# Altium PCB Group2_PCB.PcbDoc
Units mm, origin at the board's own origin, x right, y up, seen from the top; angles counter-clockwise.
Board outline 87.88 x 127 mm, 2 copper layers (Top Layer, Bottom Layer); 106 components, 61 nets, 301 pads, 64 vias.
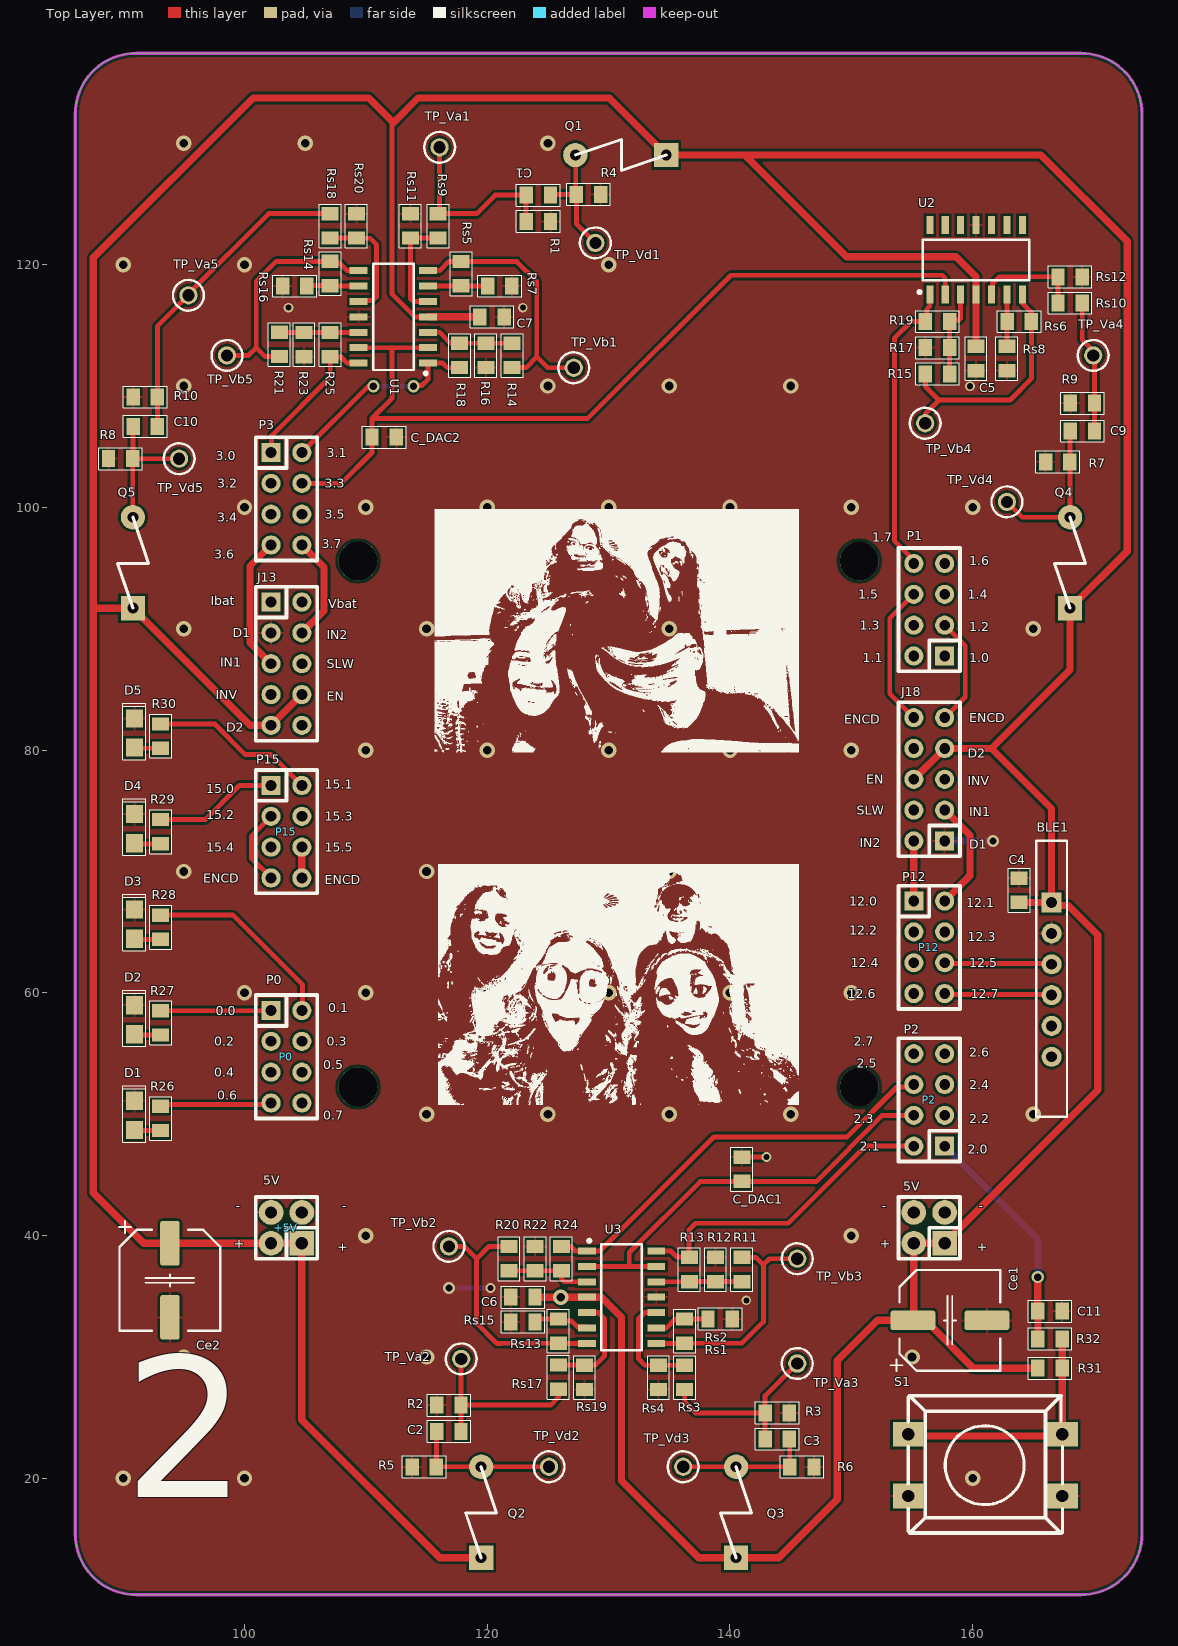
[diagram p0: Top Layer view]
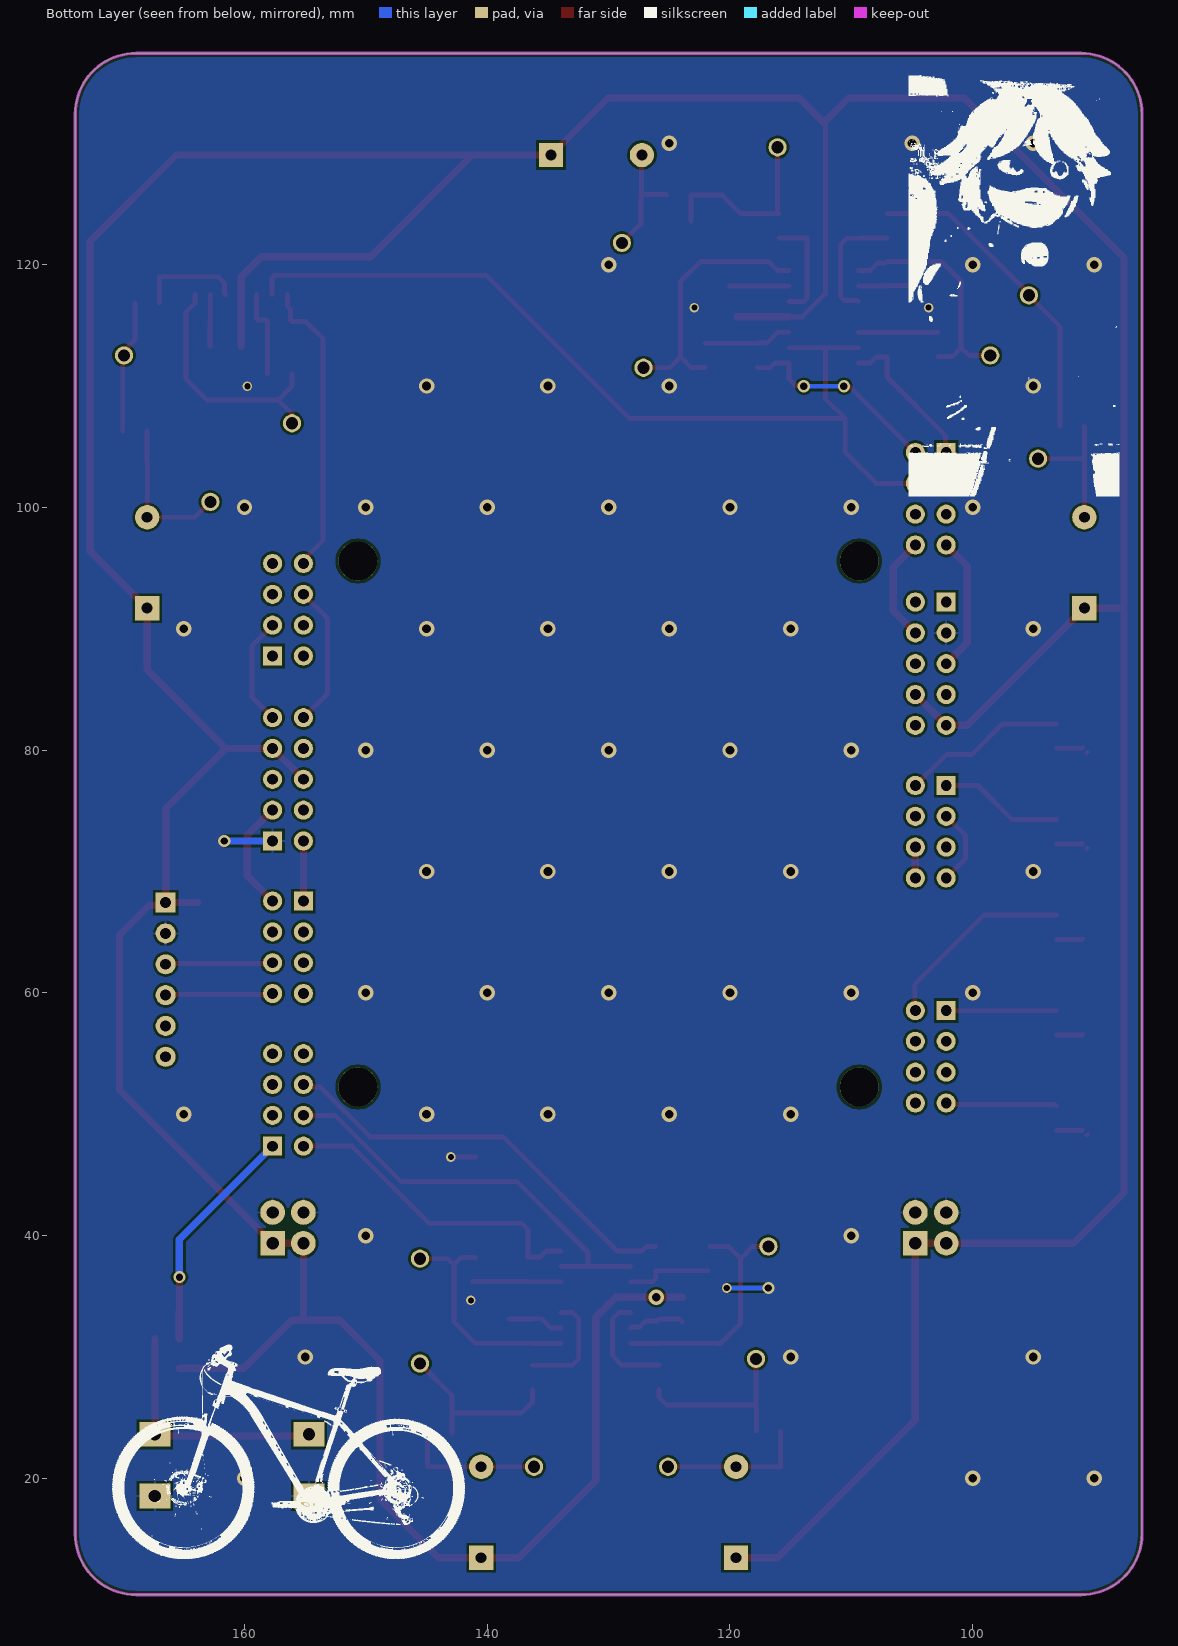
[diagram p1: Bottom Layer view, seen from below]

## Layer stack, top to bottom
Top Solder: solder mask 0.0102, Solder Resist, Dk 3.5
Top Layer: signal copper 0.0356
Dielectric 1: dielectric 0.32, FR-4, Dk 4.8
Bottom Layer: signal copper 0.0356
Bottom Solder: solder mask 0.0102, Solder Resist, Dk 3.5

## Board outline
86.058,15.414 86.058,132.414 cw(c91.058,132.414) 91.058,137.414 168.942,137.414 cw(c168.942,132.414) 173.942,132.414 173.942,15.414 cw(c168.942,15.414) 168.942,10.414 91.058,10.414 cw(c91.058,15.414)

## Design rules (kind name [scope] priority, off if disabled: settings)
BoardOutlineClearance [All] p1: gap=0.2 ignorepadtopadclearanceinfootprint=FALSE
Clearance [All] p1: gap=0.203 ignorepadtopadclearanceinfootprint=FALSE except(0.25: Arc-Hole Track-Hole SMDPad-Hole THPad-Hole Via-Hole Fill-Hole Poly-Hole Region-Hole Text-Hole)
ComponentClearance [All] p1: gap=0.127 collisioncheckmode=3 verticalgap=0.127 showdistances=TRUE
DiffPairsRouting [All] p1: maxlimit=0.381 minlimit=0.203 mostfreqgap=0.203 toplayer_minwidth=0.203 toplayer_maxwidth=25.4 toplayer_prefwidth=0.203 bottomlayer_minwidth=0.203 bottomlayer_maxwidth=25.4 bottomlayer_prefwidth=0.203 maxuncoupledlength=12.7
Height [All] p1: minheight=0 maxheight=1816.048 prefheight=12.7
HoleSize [All] p1: absolutevalues=TRUE maxlimit=6.3 minlimit=0.3 maxpercent=80.000 minpercent=20.000
HoleToHoleClearance [All] p1: gap=0.25 allowstackedmicrovias=FALSE
MinimumAnnularRing [All] p1: minimumring=0.076
MinimumSolderMaskSliver [All] p1: minsoldermaskwidth=0
PlaneClearance [All] p1: clearance=0.203
PlaneConnect PlaneConnectPowerPads [InPadClass('PowerPads')] p1: planeconnectstyle=Direct reliefexpansion=0.508 reliefentries=4 reliefconductorwidth=0.254 reliefairgap=0.254
PlaneConnect [All] p2: pad.planeconnectstyle=Relief pad.reliefexpansion=0.3 pad.reliefentries=4 pad.reliefconductorwidth=0.203 pad.reliefairgap=0.203 via.planeconnectstyle=Direct via.reliefexpansion=0.3 via.reliefentries=4 via.reliefconductorwidth=0.127 via.reliefairgap=0.127
PolygonConnect PolygonConnectPowerPads [All vs (InPadClass('PowerPads'))] p1: connectstyle=Direct reliefconductorwidth=0.254 reliefentries=4 polygonreliefangle="90 Angle" airgapwidth=0.254
PolygonConnect [All] p2: thpad.connectstyle=Relief thpad.reliefconductorwidth=0.203 thpad.reliefentries=4 thpad.polygonreliefangle="90 Angle" thpad.airgapwidth=0.203 smdpad.connectstyle=Relief smdpad.reliefconductorwidth=0.203 smdpad.reliefentries=4 smdpad.polygonreliefangle="90 Angle" smdpad.airgapwidth=0.203 via.connectstyle=Direct via.reliefconductorwidth=0.127 via.reliefentries=4 via.polygonreliefangle="90 Angle" via.airgapwidth=0.127
RoutingVias [All] p1: holewidth=0.3 width=0.6 viastyle="Through Hole" minholewidth=0.3 minwidth=0.6 maxholewidth=0.6 maxwidth=6.6
SilkToSilkClearance [All] p1: silktosilkclearance=0
SilkToSolderMaskClearance [IsPad] p1: minsilkscreentomaskgap=0.127 clearancetoexposedcopper=TRUE
SolderMaskExpansion [All] p1: expansion=0.075 istentingtop=FALSE
SupplyNets "Schematic Supply Nets_3" [InNet('Vref_DAC')] p1: voltage=0.000
SupplyNets "Schematic Supply Nets_2" [InNet('GND')] p2: voltage=0.000
SupplyNets "Schematic Supply Nets_1" [InNet('5V')] p3: voltage=0.000
SupplyNets "Schematic Supply Nets" [InNet('Vref_DAC2')] p4: voltage=0.000
Width [All] p1: maxlimit=25.4 minlimit=0.203 preferedwidth=0.203 minimp=50.000000 maximp=50.000000 favimp=50.000000
20 further rules are at their usual default settings.

## Components (designator, comment, footprint, x,y, rotation, side; value= is the part's Value field where it differs from the comment)
5V "5V" IDC4 157.686,39.37 r90 top locked
+5V "5V" IDC4 104.727,39.37 r90 top locked
BLE1 "BLE Module Header" HM10_HDR1X6 166.497,67.437 r270 top
C1 "0.27u" "0805 CAP" 124.206,125.73 r180 top
C2 "0.27u" "0805 CAP" 116.84,23.876 r0 top
C3 "0.27u" "0805 CAP" 143.891,23.241 r180 top
C4 "100nF" "0805 CAP" 163.83,68.453 r90 top
C5 "100nF" "0805 CAP" 160.274,112.268 r270 top
C6 "100nF" "0805 CAP" 122.936,34.925 r180 top
C7 "100nF" "0805 CAP" 120.396,115.697 r0 top
C9 "0.27u" "0805 CAP" 169.037,106.299 r0 top
C10 "0.27u" "0805 CAP" 91.821,106.68 r0 top
C11 "100n" "0805 CAP" 166.37,33.782 r0 top
C_DAC1 "0.1uF" "0805 CAP" 140.97,45.466 r90 top
C_DAC2 "0.1uF" "0805 CAP" 111.506,105.791 r0 top
Ce1 "100uF" "CAP POL 8x5.4mm SMT" 158.115,33.02 r0 top
Ce2 "100uF" "CAP POL 8x5.4mm SMT" 93.853,36.322 r270 top
D1 "LTST-C170KGKT" "0805 LED" 90.932,49.911 r90 top
D2 "LTST-C170KGKT" "0805 LED" 90.932,57.785 r90 top
D3 "LTST-C170KGKT" "0805 LED" 90.932,65.659 r90 top
D4 "LTST-C170KGKT" "0805 LED" 90.932,73.533 r90 top
D5 "LTST-C170KGKT" "0805 LED" 90.932,81.407 r90 top
J13 "CON10" IDC10 102.187,92.202 r270 top locked
J18 "CON10" IDC10 157.686,72.517 r90 top locked
P0 "P0" idc8 102.187,58.547 r270 top locked
P1 "P1" idc8 157.686,87.757 r90 top locked
P2 "P2" idc8 157.686,47.371 r90 top locked
P3 "P3" idc8 102.187,104.521 r270 top locked
P12 "P12" idc8 155.146,67.564 r270 top locked
P15 "P15" idc8 102.187,77.089 r270 top locked
Q1 "VEMT3700" VEMT3700 137.287,132.842 r180 top locked
Q2 "VEMT3700" VEMT3700 123.31,10.922 r90 top locked
Q3 "VEMT3700" VEMT3700 144.31,10.922 r90 top locked
Q4 "VEMT3700" VEMT3700 171.831,89.154 r90 top locked
Q5 "VEMT3700" VEMT3700 94.615,89.154 r90 top locked
R1 "100k" "0805 RES" 124.206,123.571 r180 top
R2 "100k" "0805 RES" 116.84,26.035 r0 top
R3 "100k" "0805 RES" 143.891,25.4 r180 top
R4 "33k" "0805 RES" 128.339,125.792 r180 top
R5 "33k" "0805 RES" 114.808,20.955 r0 top
R6 "33k" "0805 RES" 145.923,20.955 r180 top
R7 "33k" "0805 RES" 167.005,103.759 r0 top
R8 "33k" "0805 RES" 89.789,104.013 r0 top
R9 "100k" "0805 RES" 169.037,108.585 r0 top
R10 "100k" "0805 RES" 91.821,109.093 r0 top
R11 "2k" "0805 RES" 140.97,37.211 r270 top
R12 "40k" "0805 RES" 138.811,37.211 r90 top
R13 "50k" "0805 RES" 136.652,37.211 r270 top
R14 "2k" "0805 RES" 122.047,112.522 r90 top
R15 "2k" "0805 RES" 157.099,110.998 r0 top
R16 "40k" "0805 RES" 119.888,112.522 r270 top
R17 "40k" "0805 RES" 157.099,113.157 r180 top
R18 "50k" "0805 RES" 117.729,112.522 r90 top
R19 "50k" "0805 RES" 157.099,115.316 r0 top
R20 "2k" "0805 RES" 121.793,38.1 r270 top
R21 "2k" "0805 RES" 102.87,113.427 r90 top
R22 "40k" "0805 RES" 123.952,38.1 r90 top
R23 "40k" "0805 RES" 104.902,113.411 r270 top
R24 "50k" "0805 RES" 126.111,38.1 r270 top
R25 "50k" "0805 RES" 107.061,113.411 r90 top
R26 "68" "0805 RES" 93.091,49.657 r270 top
R27 "68" "0805 RES" 93.091,57.531 r270 top
R28 "68" "0805 RES" 93.091,65.405 r270 top
R29 "68" "0805 RES" 93.091,73.279 r270 top
R30 "68" "0805 RES" 93.091,81.153 r270 top
R31 "10k" "0805 RES" 166.37,29.083 r0 top
R32 "10k" "0805 RES" 166.37,31.496 r0 top
Rs1 "36k" "0805 RES" 136.271,32.131 r270 top
Rs2 "10k" "0805 RES" 139.192,33.147 r180 top
Rs3 "10k" "0805 RES" 136.271,28.321 r90 top
Rs4 "36k" "0805 RES" 134.112,28.321 r90 top
Rs5 "36k" "0805 RES" 117.856,119.253 r90 top
Rs6 "36k" "0805 RES" 163.83,115.316 r0 top
Rs7 "10k" "0805 RES" 121.031,118.237 r180 top
Rs8 "10k" "0805 RES" 162.814,112.268 r90 top
Rs9 "10k" "0805 RES" 115.951,123.19 r270 top
Rs10 "10k" "0805 RES" 168.021,116.84 r180 top
Rs11 "36k" "0805 RES" 113.665,123.19 r270 top
Rs12 "36k" "0805 RES" 168.021,118.999 r180 top
Rs13 "36k" "0805 RES" 125.857,32.131 r270 top
Rs14 "36k" "0805 RES" 107.061,119.269 r90 top
Rs15 "10k" "0805 RES" 122.936,32.893 r0 top
Rs16 "10k" "0805 RES" 104.14,118.237 r0 top
Rs17 "10k" "0805 RES" 125.857,28.337 r90 top
Rs18 "10k" "0805 RES" 107.061,123.19 r270 top
Rs19 "36k" "0805 RES" 128.016,28.321 r90 top
Rs20 "36k" "0805 RES" 109.22,123.19 r270 top
S1 "SW-PB" SW-PB 164.846,18.034 r180 top
TP_Va1 "5003" TP_TH 116.078,129.667 r90 top
TP_Va2 "5003" TP_TH 117.856,29.845 r90 top
TP_Va3 "5003" TP_TH 145.542,29.464 r90 top
TP_Va4 "5003" TP_TH 169.926,112.522 r90 top
TP_Va5 "5003" TP_TH 95.377,117.475 r90 top
TP_Vb1 "5003" TP_TH 127.127,111.506 r90 top
TP_Vb2 "5003" TP_TH 116.84,39.116 r90 top
TP_Vb3 "5003" TP_TH 145.542,38.1 r90 top
TP_Vb4 "5003" TP_TH 156.083,106.934 r90 top
TP_Vb5 "5003" TP_TH 98.552,112.522 r90 top
TP_Vd1 "5003" TP_TH 128.905,121.793 r90 top
TP_Vd2 "5003" TP_TH 125.095,20.955 r90 top
TP_Vd3 "5003" TP_TH 136.144,20.955 r90 top
TP_Vd4 "5003" TP_TH 162.814,100.457 r90 top
TP_Vd5 "5003" TP_TH 94.615,104.013 r90 top
U1 "LM324DR2G" SOIC-14 112.268,115.697 r180 top
U2 "LM324DR2G" SOIC-14 160.274,120.396 r90 top
U3 "" SOIC-14 131.064,34.925 r0 top

## Footprints (in the part's own frame and the unit in brackets; to place one, negate y for a bottom-side part, rotate by r counter-clockwise, add the part's x,y. Pads: shape width x height; smd on the part's side, far side on the other; paste and mask are expansions set on the pad)
"0805 CAP" [mm] "http://www.digikey.co.nz/Web%20Export/Supplier%20Content/Vishay_8026/PDF/VishayBeyschlag_SolderPad.pdf?redirected=1 with dimension G modified by +0.25mm"
  rect 1.1x1.4 smd: 1(-1,0) 2(1,0)
  silkscreen extent -1.8,-0.9 1.8,0.9, body extent -1.04,-0.66 1.04,0.66, height 0.61
"0805 LED" [mm] "RED AS AlGaAs SMD LED, Body; 2mm x 1.25 mm (LxW)"
  rect 1.5x1.4 smd: 1(-1.2,0) 2(1.2,0)
  silkscreen extent -2.2,-0.95 2.45,0.95, body extent -1,-0.63 1,0.63, height 1.1
"0805 RES" [mm] "http://www.digikey.co.nz/Web%20Export/Supplier%20Content/Vishay_8026/PDF/VishayBeyschlag_SolderPad.pdf?redirected=1 with dimension G modified by +0.25mm"
  rect 1.1x1.4 smd: 1(-1,0) 2(1,0)
  silkscreen extent -1.8,-0.9 1.8,0.9, body extent -1.04,-0.66 1.04,0.66, height 0.61
"CAP POL 8x5.4mm SMT" [mm]
  round 0.508 on Mech15: 0(0,0)
  rrect25% 3.7x1.6 smd: 1(-3.05,0) 2(3.05,0)
  silkscreen extent -4.9,-4.2 4.15,4.15, body extent -4.5,-4.15 4.5,4.15, height 5.4
HM10_HDR1X6 [mil] "Connector; Header; 6 Position"
  rect 65x65 hole 35.43: 1(0,0)
  round 65 hole 35.43: 2(100,0) 3(200,0) 4(300,0) 5(400,0) 6(500,0)
  silkscreen extent -200,-50 695,50, body extent -142,-39 571,228, height 1843
IDC4 [mil]
  rect 80x80 hole 40: 1(0,0)
  round 80 hole 40: 2(0,100) 3(100,0) 4(100,100)
  silkscreen extent -50,-50 150,150
idc8 [mil]
  rect 62x62 hole 35: 1(0,0)
  round 62 hole 35: 2(0,100) 3(100,0) 4(100,100) 5(200,0) 6(200,100) 7(300,0) 8(300,100)
  silkscreen extent -50,-50 350,150
IDC10 [mil]
  rect 62x62 hole 35: 1(0,0)
  round 62 hole 35: 2(0,100) 3(100,0) 4(100,100) 5(200,0) 6(200,100) 7(300,0) 8(300,100) 9(400,0) 10(400,100)
  silkscreen extent -50,-50 450,150
SOIC-14 [mm] "SOIC, 14-Leads, Body 8.75x4mm, Pitch 1.27mm"
  rect 1.48x0.58 smd: 1(-2.86,3.81) 2(-2.86,2.54) 3(-2.86,1.27) 4(-2.86,0) 5(-2.86,-1.27) 6(-2.86,-2.54) 7(-2.86,-3.81) 8(2.86,-3.81) 9(2.86,-2.54) 10(2.86,-1.27) 11(2.86,0) 12(2.86,1.27) 13(2.86,2.54) 14(2.86,3.81)
  silkscreen extent -2.79,-4.38 1.67,4.77, body extent -3.1,-4.38 3.1,4.37, height 1.75
SW-PB [mil]
  rect 100x80 hole 40: 1(-100,-20) 1(400,-20) 2(-100,-220) 2(400,-220)
  silkscreen extent -100,-345 400,100
TP_TH [mm] "Test Point, Through Hole, Dia 2.54mm"
  round 1.5 hole 1: 1(0,0)
  silkscreen extent -1.27,-1.27 1.27,1.27, body extent -1.27,-1.27 1.27,1.27, height 4.57
VEMT3700 [mm]
  rect 2x2 hole 0.9: 1(2.54,3.81)
  round 2 hole 0.9: 2(10.033,3.81)
  silkscreen extent 2.54,2.54 10.03,5.08

## Part data
5V +5V: library part CON4, "Connector"
BLE1: library part BLEModule_TH, "2.54mm pitch 6-pin header for BLE module", LatestRevisionDate=17-Jul-2002, LatestRevisionNote="Re-released for DXP Platform.", Publisher="Altium Limited"
C1 C2 C3 C4 C5 C6 C7 C9 C10 C11 C_DAC1 C_DAC2: library part CerCap_SMT_0805, "SMT ceramic capacitor 0805 size"
Ce1 Ce2: library part ElecCap_SMT_8D0, "CAP ALUM 22UF 20% 50V SMD (Model: UWX1H220MCL1GB)", Capacitance 1="22 µF", ESR (Equivalent Series Resistance)=-, Lifetime @ Temp.="2000 Hrs @ 85°C", Manufacturer=Nichicon, Manufacturer Part Number=UWX1V220MCL1GB, Operating Temperature="-40°C ~ 85°C", Package / Case="Radial, Can - SMD", Supplier Part Number 1=493-2136-1-ND, Tolerance=±20%, Applications="General Purpose", Category=Capacitors, ComponentLink1Description=http://nichicon-us.com/english/products/pdfs/e-uwx.pdf, ComponentLink1URL=http://nichicon-us.com/english/products/pdfs/e-uwx.pdf, Height - Seated (Max)="0.213\" (5.40mm)", Lead Spacing=-, Mounting Type="Surface Mount", Packaging="Cut Tape (CT)", Part Status=Active, Polarization=Polar, Pricing 1="1=0.59, 10=0.406, 100=0.2304, 500=0.16268 (NZD)", Ratings=-, Revision="July-2002: Re-released for DXP Platform.", RoHS="RoHS Compliant", Size / Dimension="0.248\" Dia (6.30mm)", Stock 1=680, Supplier 1=Digi-Key, Surface Mount Land Size="0.260\" L x 0.260\" W (6.60mm x 6.60mm)"
D1 D2 D3 D4 D5: library part LED_SMT_0805, "SMT LED 0805 size", Color=Green, Current - Test=20mA, Lens Color=Colorless, Manufacturer="Lite-On Inc.", Millicandela Rating=35mcd, Package / Case="0805 (2012 Metric)", Supplier Part Number 1=160-1414-1-ND, Voltage - Forward (Vf) (Typ)=2V, Category=Optoelectronics, ComponentLink1Description=http://optoelectronics.liteon.com/upload/download/DS22-2000-073/LTST-C170KGKT.pdf, ComponentLink1URL=http://optoelectronics.liteon.com/upload/download/DS22-2000-073/LTST-C170KGKT.pdf, Features=-, Height (Max)=1.10mm, Lens Style/Size="Rectangle with Flat Top, 1.40mm x 1.25mm", Lens Transparency=Clear, Manufacturer Part Number=LTST-C170KGKT, Mounting Type="Surface Mount", Packaging="Cut Tape (CT)", Part Status=Active, Pricing 1="1=0.62, 10=0.459, 25=0.338, 100=0.2415, 250=0.16416, 500=0.14486, 1000=0.11347 (NZD)", RoHS="RoHS Compliant", Size / Dimension="2.00mm L x 1.25mm W", Stock 1=503069, Supplier 1=Digi-Key, Viewing Angle=130°, Wavelength - Dominant=571nm, Wavelength - Peak=574nm
J13 J18: "Connector"
P0 P1 P2 P3: library part CON8, "Connector"
P12 P15: library part CON8_1, "Connector"
Q1 Q2 Q3 Q4 Q5: "Silicon NPN Phototransistor"
R1 R2 R3 R4 R5 R6 R7 R8 R9 R10 R11 R12 R13 R14 R15 R16 R17 R18 R19 R20 R21 R22 R23 R24 R25 R26 R27 R28 R29 R30 R31 R32 Rs1 Rs2 Rs3 Rs4 Rs5 Rs6 Rs7 Rs8 Rs9 Rs10 Rs11 Rs12 Rs13 Rs14 Rs15 Rs16 Rs17 Rs18 Rs19 Rs20: library part Res_SMT_0805, "0805 resistor", ComponentLink1Description=https://nz.mouser.com/datasheet/2/315/AOA0000C304-1149620.pdf, LatestRevisionDate=17-Jul-2002, LatestRevisionNote="Re-released for DXP Platform.", PackageReference=AXIAL-0.4, Published=8-Jun-2000, Publisher="Altium Limited"
S1: "Push Button Switch"
TP_Va1 TP_Va2 TP_Va3 TP_Va4 TP_Va5 TP_Vb1 TP_Vb2 TP_Vb3 TP_Vb4 TP_Vb5 TP_Vd1 TP_Vd2 TP_Vd3 TP_Vd4 TP_Vd5: library part TestPoint, "Test Point, Orange, 1-Pin THD, RoHS", Forward Current="3 A", Forward Voltage="1.08 V", Max Operating Temperature="150 degC", Max Surge Current="80 A", Min Operating Temperature="-65 degC", Package Quantity=500, Peak Reverse Current="600 uA", ComponentLink1Description="Manufacturer URL", ComponentLink1URL=http://www.keyelco.com/, ComponentLink2Description=Datasheet, ComponentLink2URL=http://keyelco.com/userAssets/file/M65p56.pdf, DatasheetVersion=Jun-15, Diameter="5.3 mm", Height="0.25 inch", Length="9.5 mm", Mount="Through Hole", PackageDescription="1-Pin Through Hole Device, Dia 2.54 mm", PackageReference=5003, Packaging=Bulk, Pins=2, Radiation Hardening=No, REACH SVHC="No SVHC", RoHSCompliant=true, Weight="0.01 lb", Width="0.25 inch"
U1 U2: library part LM324DR_SMT_SOIC16, "Single Supply Quad Operational Amplifier, 3 to 32 V, 0 to 70 degC, 14-Pin SOIC, Pb-Free, Tape and Reel", Manufacturer="On Semiconductor", ComponentLink1Description="Manufacturer URL", ComponentLink1URL=http://www.onsemi.com/, ComponentLink2Description=Datasheet, ComponentLink2URL=http://www.onsemi.cn/pub_link/Collateral/LM324-D.PDF, ComponentLink3Description="Package Specification", ComponentLink3URL=http://www.onsemi.com/pub_link/Collateral/751A-03.PDF, DatasheetVersion="Rev. 25", Mounting Technology="Surface Mount", PackageDescription="14-Pin Small Outline Integrated Circuit, Body 8.65 x 3.9 mm, Pitch 1.27 mm", PackageReference=SOIC-14-751A-03, PackageVersion="Rev. K, 05/2011", Packing="Tape and Reel", PartNumber=LM324DR2G, RoHS=TRUE, VCC Max (V)=32, VCC Min (V)=3
U3: library part LM324DR_SMT_SOIC16, "Single Supply Quad Operational Amplifier, 3 to 32 V, 0 to 70 degC, 14-Pin SOIC, Pb-Free, Tape and Reel", Manufacturer="On Semiconductor", PartNumber=LM324DR2G, ComponentLink1Description="Manufacturer URL", ComponentLink1URL=http://www.onsemi.com/, ComponentLink2Description=Datasheet, ComponentLink2URL=http://www.onsemi.cn/pub_link/Collateral/LM324-D.PDF, ComponentLink3Description="Package Specification", ComponentLink3URL=http://www.onsemi.com/pub_link/Collateral/751A-03.PDF, DatasheetVersion="Rev. 25", Mounting Technology="Surface Mount", PackageDescription="14-Pin Small Outline Integrated Circuit, Body 8.65 x 3.9 mm, Pitch 1.27 mm", PackageReference=SOIC-14-751A-03, PackageVersion="Rev. K, 05/2011", Packing="Tape and Reel", RoHS=TRUE, VCC Max (V)=32, VCC Min (V)=3

## Free pads (board coordinates)
  round 3.2 hole 3.2 unplated: 1(109.35,52.248) 1(109.35,95.58) 1(150.65,52.248) 1(150.65,95.58)

## Via types
v1: diameter 1.27, hole 0.711, Top Layer to Bottom Layer, 53 vias
v2: diameter 0.8, hole 0.5, Top Layer to Bottom Layer, 6 vias
v3: diameter 1, hole 0.6, Top Layer to Bottom Layer, 5 vias

## Nets (pads, with @x,y where several pads share a name; then routed paths per layer and width w, separated by ;. In a path a pad name is that pad's centre, name@x,y a point inside that pad or via, vN(x,y) a via of type N, cw(c..) or ccw(c..) an arc to the next point about the centre after c; other vN are vias at no path point)
5V: 5V.1 5V.2 +5V.1 +5V.2 BLE1.1 C4.1 C5.1 C6.1 C7.1 Ce1.1 Ce2.1 J13.8 J13.9 J18.6 J18.7 Q1.1 Q2.1 Q3.1 Q4.1 Q5.1 R31.1 U1.4 U2.4 U3.4 | length 491
  Top Layer w0.4: 112.268,131.699 112.141,131.572 112.141,117.594 114.038,115.697 U1.4
  Top Layer w0.6: J13.8 J13.9 100.457,82.042 Q5.1 87.666,91.694 87.539,91.821 ; U1.4 C7.1 ; Q2.1 116.078,13.462 104.727,24.813 +5V.1 +5V.2 93.855,39.37 Ce2.1 91.696,39.372 87.539,43.529 87.539,91.821 ; C6.1 v1(126.07,34.925) U3.4 129.413,34.925 131.064,33.274 131.064,19.812 137.414,13.462 Q3.1 144.018,13.462 148.844,18.288 148.844,29.718 152.146,33.02 Ce1.1 ; J18.6 J18.7 161.544,80.137 ; C5.1 U2.4 160.274,118.999 158.623,120.65 149.606,120.65 141.224,129.032 ; C4.1 166.481,67.453 BLE1.1 ; R31.1 160.052,29.083 156.115,33.02 Ce1.1 ; 87.539,91.821 87.539,120.559 100.711,133.731 110.236,133.731 112.268,131.699 114.3,133.731 130.048,133.731 Q1.1 141.224,129.032 ; 141.224,129.032 165.608,129.032 172.72,121.92 172.72,96.393 Q4.1 168.021,86.614 161.544,80.137 ; Ce1.1 155.146,33.101 5V.2 5V.1 170.307,51.991 170.307,64.77 167.871,67.206 166.728,67.206 BLE1.1 ; 161.544,80.137 166.497,75.184 BLE1.1
Button: C11.1 P2.1 R32.1 | length 19.1
  Top Layer w0.4: v3(165.354,36.576) v3@165.362,36.568 ; C11.1@165.362,33.79 C11.1
  Top Layer w0.6: C11.1@165.362,33.79 v3@165.362,36.568 ; R32.1 C11.1
  Bottom Layer w0.4: v3(165.354,36.576) v3@165.37,36.592
  Bottom Layer w0.6: P2.1 165.37,39.687 v3@165.37,36.592
ENCD_L_1: P15.3 P15.7 | length 6.4
  Top Layer w0.4: P15.7 100.584,71.072 100.584,72.946 P15.3
ENCD_L_2: P15.6 P15.8 | length 2.5
  Top Layer w0.6: P15.8 P15.6
ENCD_R_1: J18.9 P1.3 | length 9
  Top Layer w0.4: J18.9 159.385,84.376 159.385,88.598 P1.3
ENCD_R_2: J18.10 P1.6 | length 11.8
  Top Layer w0.4: J18.10 153.162,84.661 153.162,90.853 P1.6
GND: 5V.3 5V.4 +5V.3 +5V.4 BLE1.2 C4.2 C5.2 C6.2 C7.2 C11.2 C_DAC1.2 C_DAC2.2 Ce1.2 Ce2.2 D1.2 D2.2 D3.2 D4.2 D5.2 J13.3 J18.1 R1.1 R2.1 R3.1 R4.1 R5.1 R6.1 R7.1 R8.1 R9.1 R10.1 R12.2 R16.2 R17.2 R22.2 R23.2 Rs2.1 Rs4.1 Rs7.1 Rs8.1 Rs11.1 Rs12.1 Rs15.1 Rs16.1 Rs19.1 Rs20.1 S1.1 U1.11 U2.11 U3.11 | length 9.5
  Top Layer w0.4: C_DAC1.2 140.978,46.474 142.994,46.474 v2(143.002,46.482)
  Bottom Layer w0.4: v3(116.84,35.687) v2(120.269,35.687)
  Bottom Layer w0.6: J18.1 v3(161.671,72.517)
  other v1: 90,20 100,20 160,20 95,30 115,30 155,30 110,40 150,40 115,50 125,50 135,50 145,50 165,50 100,60 110,60 120,60 130,60 140,60 150,60 95,70 115,70 125,70 135,70 145,70 110,80 120,80 130,80 140,80 150,80 95,90 115,90 125,90 135,90 145,90 165,90 100,100 110,100 120,100 130,100 140,100 150,100 160,100 95,110 125,110 135,110 145,110 90,120 100,120 130,120 95,130 105,130 125,130
  other v2: 141.351,34.671 159.766,109.982 103.632,116.459 122.936,116.459
IN_L_1: J13.5 P3.7 | length 11.2
  Top Layer w0.6: J13.5 100.457,88.852 100.457,95.171 P3.7
IN_L_2: J13.4 P3.8 | length 8.8
  Top Layer w0.6: J13.4 106.553,91.488 106.553,95.075 P3.8
IN_R_1: J18.3 P12.2 | length 9.2
  Top Layer w0.6: P12.2 159.766,69.644 159.766,73.002 157.711,75.057 J18.3
IN_R_2: J18.2 P12.1 | length 5
  Top Layer w0.6: P12.1 J18.2
LED1: P0.7 R26.1 | length 9.2
  Top Layer w0.4: R26.1 93.226,50.792 102.052,50.792 P0.7
LED2: P0.1 R27.1 | length 9.1
  Top Layer w0.4: R27.1 102.171,58.531 P0.1
LED3: P0.2 R28.1 | length 16.2
  Top Layer w0.4: R28.1 99.076,66.405 104.775,60.706 104.775,58.595 P0.2
LED4: P15.1 R29.1 | length 10.3
  Top Layer w0.4: R29.1 96.758,74.279 99.568,77.089 P15.1
LED5: P15.2 R30.1 | length 13.7
  Top Layer w0.4: R30.1 97.552,82.153 100.076,79.629 102.187,79.629 P15.2
NetD1_1: D1.1 R26.2 | length 2.3
  Top Layer w0.4: D1.1@90.551,48.33 D1.1@90.605,48.276 ; D1.1 90.986,48.657 R26.2
NetD2_1: D2.1 R27.2 | length 2.2
  Top Layer w0.4: D2.1 90.986,56.531 R27.2
NetD3_1: D3.1 R28.2 | length 2.2
  Top Layer w0.4: D3.1 90.986,64.405 R28.2
NetD4_1: D4.1 R29.2 | length 2.3
  Top Layer w0.4: D4.1@90.551,71.952 D4.1@90.605,71.898 ; D4.1 90.986,72.279 R29.2
NetD5_1: D5.1 R30.2 | length 2.3
  Top Layer w0.4: D5.1@90.551,79.826 D5.1@90.605,79.772 ; D5.1 90.986,80.153 R30.2
NetR11_2: R11.2 R12.1 R13.2 U3.12 | length 7.3
  Top Layer w0.4: U3.12 133.932,36.203 136.644,36.203 R13.2 138.938,36.211 R11.2@141.224,36.211
NetR14_2: R14.2 R16.1 R18.2 U1.3 | length 7.3
  Top Layer w0.4: U1.3 116.078,114.427 116.967,113.538 117.713,113.538 R18.2 R16.1 R14.2
NetR15_2: R15.2 R17.1 R19.2 U2.3 | length 7.3
  Top Layer w0.4: R15.2 R17.1 R19.2 158.227,115.444 158.878,115.444 159.004,115.57 U2.3
NetR20_2: R20.2 R22.1 R24.2 U3.3 | length 7.2
  Top Layer w0.4: R20.2 R22.1 R24.2 126.111,36.449 126.365,36.195 U3.3
NetR21_2: R21.2 R23.1 R25.2 U1.12 | length 6.6
  Top Layer w0.4: R21.2 102.878,114.419 104.894,114.419 R23.1 R25.2 107.069,114.419 109.4,114.419 U1.12
NetR31_2: R31.2 R32.2 S1.2 | length 20.9
  Top Layer w0.6: S1.2@154.686,23.622 154.559,23.495 167.259,23.495 167.386,23.622 167.37,23.638 R31.2 R32.2
NetRs1_1: Rs1.1 Rs2.2 U3.9 | length 4.6
  Top Layer w0.4: U3.9 134.747,32.385 135.509,33.147 136.255,33.147 Rs1.1 138.176,33.131 Rs2.2
NetRs3_2: Rs3.2 Rs4.2 U3.10 | length 9
  Top Layer w0.4: U3.10 132.969,33.655 132.461,33.147 132.461,29.845 132.985,29.321 Rs4.2 Rs3.2
NetRs5_1: Rs5.1 Rs7.2 U1.6 | length 4.9
  Top Layer w0.4: U1.6 115.136,118.245 117.848,118.245 Rs5.1 120.015,118.253 Rs7.2
NetRs6_1: Rs6.1 Rs8.2 U2.6 | length 4.3
  Top Layer w0.4: Rs8.2 162.83,113.284 Rs6.1 162.822,115.324 162.822,117.528 U2.6
NetRs9_2: Rs9.2 Rs11.2 U1.5 | length 8.8
  Top Layer w0.4: U1.5 113.899,116.967 113.665,117.201 Rs11.2 Rs9.2
NetRs10_2: Rs10.2 Rs12.2 U2.5 | length 8.7
  Top Layer w0.4: U2.5 161.634,117.626 161.634,118.454 162.179,118.999 Rs12.2 Rs10.2
NetRs13_1: Rs13.1 Rs15.2 U3.6 | length 4.7
  Top Layer w0.4: Rs15.2 124.174,33.131 Rs13.1 126.018,32.97 126.923,32.97 127.418,32.475 128.114,32.475 U3.6
NetRs14_1: Rs14.1 Rs16.2 U1.9 | length 4.3
  Top Layer w0.4: Rs16.2 105.172,118.269 Rs14.1 107.077,118.253 109.392,118.253 U1.9
NetRs17_2: Rs17.2 Rs19.2 U3.5 | length 8.9
  Top Layer w0.4: Rs17.2 125.865,29.329 128.008,29.329 Rs19.2 128.032,29.337 128.905,29.337 129.667,30.099 129.667,33.147 129.159,33.655 U3.5
NetRs18_2: Rs18.2 Rs20.2 U1.10 | length 10
  Top Layer w0.4: Rs18.2 Rs20.2 109.236,122.174 110.363,122.174 110.871,121.666 110.871,117.348 110.58,117.057 109.498,117.057 U1.10
Va1: C1.2 R1.2 Rs9.1 TP_Va1.1 | length 15.6
  Top Layer w0.4: TP_Va1.1 116.078,124.317 Rs9.1 115.967,124.206 119.126,124.206 120.65,125.73 C1.2 R1.2
Va2: C2.2 R2.2 Rs17.1 TP_Va2.1 | length 14.9
  Top Layer w0.4: C2.2 R2.2 ; TP_Va2.1 117.848,29.837 117.848,26.043 R2.2 ; Rs17.1 125.857,26.67 125.222,26.035 R2.2
Va3: C3.2 R3.2 Rs3.1 TP_Va3.1 | length 14.8
  Top Layer w0.4: Rs3.1 136.271,26.289 137.16,25.4 R3.2 ; C3.2@142.891,23.733 R3.2 ; TP_Va3.1 142.891,26.813 R3.2
Va4: C9.2 R9.2 Rs10.1 TP_Va4.1 | length 11
  Top Layer w0.4: Rs10.1 169.021,113.808 170.037,112.792 R9.2 C9.2 C9.2@170.053,106.283
Va5: C10.2 R10.2 Rs18.1 TP_Va5.1 | length 26.4
  Top Layer w0.4: C10.2 R10.2 92.821,114.919 TP_Va5.1 ; TP_Va5.1@95.313,117.538 101.981,124.206 107.045,124.206 Rs18.1
Vb1: R14.1 Rs5.2 TP_Vb1.1 U1.7 | length 22
  Top Layer w0.4: U1.7 116.078,119.507 116.84,120.269 117.84,120.269 Rs5.2 122.444,120.253 124.079,118.618 124.079,112.395 ; R14.1 123.206,111.522 124.079,112.395 ; TP_Vb1.1 124.968,111.506 124.079,112.395
Vb2: R20.1 Rs13.2 TP_Vb2.1 U3.7 | length 20.8
  Top Layer w0.4: TP_Vb2.1 118.11,39.116 119.126,38.1 ; R20.1@121.666,39.116 120.142,39.116 119.126,38.1 ; U3.7 128.196,31.123 125.865,31.123 Rs13.2 121.174,31.131 121.158,31.115 120.777,31.115 119.126,32.766 119.126,38.1
Vb3: R11.1 Rs1.2 TP_Vb3.1 U3.8 | length 19.3
  Top Layer w0.4: U3.8 133.932,31.123 136.263,31.123 Rs1.2 140.986,31.131 142.748,32.893 142.748,37.592 ; R11.1 142.129,38.211 142.748,37.592 ; TP_Vb3.1 143.256,38.1 142.748,37.592
Vb4: R15.1 Rs6.2 TP_Vb4.1 U2.7 | length 20.1
  Top Layer w0.4: TP_Vb4.1@156.083,107.442 156.083,107.7 157.222,108.839 ; R15.1 156.099,109.962 157.222,108.839 ; U2.7@164.076,117.528 U2.7 164.084,116.82 164.318,116.586 164.338,116.586 164.83,116.094 Rs6.2 164.83,110.601 163.068,108.839 157.222,108.839
Vb5: R21.1 Rs14.2 TP_Vb5.1 U1.8 | length 19.8
  Top Layer w0.4: TP_Vb5.1 100.33,112.522 100.965,113.157 ; R21.1 101.695,112.427 100.965,113.157 ; U1.8 108.458,119.507 107.823,120.142 107.188,120.142 Rs14.2 102.616,120.269 100.965,118.618 100.965,113.157
Vd1: C1.1 Q1.2 R4.2 TP_Vd1.1 | length 10.1
  Top Layer w0.4: C1.1 125.268,125.792 R4.2 ; Q1.2 127.297,128.989 127.297,125.834 R4.2 ; TP_Vd1.1 127.339,123.359 R4.2
Vd2: C2.1 Q2.2 R5.2 TP_Vd2.1 | length 12.2
  Top Layer w0.4: C2.1 115.824,23.86 115.824,20.971 R5.2 Q2.2 TP_Vd2.1
Vd3: C3.1 Q3.2 R6.2 TP_Vd3.1 | length 10.9
  Top Layer w0.4: TP_Vd3.1 Q3.2 R6.2 C3.1@144.923,23.114
Vd4: C9.1 Q4.2 R7.2 TP_Vd4.1 | length 12.9
  Top Layer w0.4: TP_Vd4.1 164.084,99.187 Q4.2 168.013,99.195 168.013,103.751 R7.2 168.021,103.775 168.021,106.283 C9.1
Vd5: C10.1 Q5.2 R8.2 TP_Vd5.1 | length 11.3
  Top Layer w0.4: Q5.2 90.797,99.195 90.797,104.005 R8.2 ; C10.1 90.805,106.664 90.805,104.029 R8.2 ; TP_Vd5.1 R8.2
Vout1: P3.2 R18.1 U1.1 | length 17
  Top Layer w0.4: P3.2 110.188,109.982 v3(110.617,109.982) ; v3(113.919,109.982) 113.979,110.042 114.614,110.042 115.128,110.556 U1.1 116.332,111.887 116.713,111.506 117.713,111.506 R18.1
  Bottom Layer w0.4: v3(110.617,109.982) v3(113.919,109.982)
Vout2: P2.6 R24.1 U3.1 | length 34.9
  Top Layer w0.4: R24.1 126.127,39.116 126.873,39.116 127.254,38.735 U3.1 129.286,38.735 138.684,48.133 149.647,48.133 153.759,52.245 154.94,52.245 P2.6
Vout3: P2.2 R13.1 U3.14 | length 26.6
  Top Layer w0.4: U3.14 135.128,38.735 135.636,38.227 R13.1@136.636,38.227 ; R13.1 R13.1@136.636,38.227 ; P2.2 151.147,47.371 144.797,41.021 137.16,41.021 136.636,40.497 R13.1@136.636,38.227
Vout4: P1.8 R19.1 U2.1 | length 24.7
  Top Layer w0.4: P1.8 155.146,95.657 153.543,97.26 153.543,113.919 154.94,115.316 R19.1 156.21,115.427 156.21,116.332 156.464,116.586 U2.1
Vout5: P3.1 R25.1 U1.14 | length 12.5
  Top Layer w0.4: P3.1 102.235,104.569 102.235,105.918 107.061,110.744 R25.1 107.077,112.395 107.95,112.395 108.458,111.887 U1.14
Vref_DAC: C_DAC1.1 P2.4 U3.2 U3.13 | length 35
  Top Layer w0.4: U3.2 131.699,37.465 ; U3.13 131.699,37.465 ; P2.4 152.556,49.911 147.095,44.45 140.97,44.45 137.541,44.45 131.699,38.608 131.699,37.465
Vref_DAC2: C_DAC2.1 P3.4 U1.2 U1.13 U2.2 | length 75.5
  Top Layer w0.4: P3.4 107.966,101.981 110.506,104.521 110.506,106.045 110.506,107.331 ; U1.13 112.268,113.157 ; U1.2 112.268,113.157 ; U2.2 157.734,118.892 157.5,119.126 140.081,119.126 128.286,107.331 110.506,107.331 ; 110.506,107.331 112.141,108.966 112.141,113.03 112.268,113.157
VRX: BLE1.3 P12.6 | length 8.9
  Top Layer w0.4: P12.6 157.749,62.42 166.433,62.42 BLE1.3
VTX: BLE1.4 P12.8 | length 8.9
  Top Layer w0.4: P12.8 157.749,59.88 166.433,59.88 BLE1.4
pads on no net: BLE1.5 BLE1.6 Ce1.0 Ce2.0 J13.1 J13.2 J13.6 J13.7 J13.10 J18.4 J18.5 J18.8 P0.3 P0.4 P0.5 P0.6 P0.8 P1.1 P1.2 P1.4 P1.5 P1.7 P2.3 P2.5 P2.7 P2.8 P3.3 P3.5 P3.6 P12.3 P12.4 P12.5 P12.7 P15.4 P15.5 U2.8 U2.9 U2.10 U2.12 U2.13 U2.14

## Polygon pours and split planes (outlines as drawn)
GND on Top Layer "GND_L01_P003" (solid, pour order 3): 86.233,137.668 86.36,137.541 174.117,137.541 174.117,10.668 173.99,10.541 86.106,10.541
GND on Bottom Layer "GND_L02_P001" (solid, remove dead copper, pour order 1): 86.36,137.287 173.863,137.287 173.863,10.287 173.736,10.414 85.979,10.414

## Keep-outs
Keep-Out Layer:
  the board outline again, w0.254

## Silkscreen, mask and mechanical layers (free items; w line width, h text height)
Top Overlay:
  drawing of 1360 lines, arcs and shapes, not listed
  text "3.1" at 106.759,104.14 h0.75
  text "3.0" at 97.615,103.886 h0.75
  text "3.2" at 97.742,101.6 h0.75
  text "3.3" at 106.632,101.6 h0.75
  text "3.5" at 106.632,99.06 h0.75
  text "3.4" at 97.742,98.806 h0.75
  text "1.7" at 151.717,97.155 h0.75
  text "3.7" at 106.378,96.647 h0.75
  text "3.6" at 97.488,95.758 h0.75
  text "1.6" at 159.718,95.25 h0.75
  text "1.5" at 150.574,92.456 h0.75
  text "1.4" at 159.591,92.456 h0.75
  text "Ibat" at 97.234,91.948 h0.75
  text "Vbat" at 106.886,91.694 h0.75
  text "1.3" at 150.701,89.916 h0.75
  text "1.2" at 159.718,89.789 h0.75
  text "D1" at 99.012,89.281 h0.75
  text "IN2" at 106.759,89.154 h0.75
  text "1.1" at 150.955,87.249 h0.75
  text "1.0" at 159.718,87.249 h0.75
  text "IN1" at 97.996,86.868 h0.75
  text "SLW" at 106.759,86.741 h0.75
  text "INV" at 97.615,84.201 h0.75
  text "EN" at 106.759,84.074 h0.75
  text "ENCD" at 159.718,82.296 h0.75
  text "ENCD" at 149.431,82.169 h0.75
  text "D2" at 98.504,81.534 h0.75
  text "D2" at 159.591,79.375 h0.75
  text "EN" at 151.209,77.216 h0.75
  text "INV" at 159.591,77.089 h0.75
  text "15.1" at 106.632,76.835 h0.75
  text "15.0" at 96.853,76.454 h0.75
  text "SLW" at 150.447,74.676 h0.75
  text "IN1" at 159.718,74.549 h0.75
  text "15.2" at 96.853,74.295 h0.75
  text "15.3" at 106.632,74.168 h0.75
  text "IN2" at 150.701,72.009 h0.75
  text "D1" at 159.718,71.882 h0.75
  text "15.4" at 96.853,71.628 h0.75
  text "15.5" at 106.632,71.628 h0.75
  text "ENCD" at 96.599,69.088 h0.75
  text "ENCD" at 106.632,68.961 h0.75
  text "12.0" at 149.812,67.183 h0.75
  text "12.1" at 159.464,67.056 h0.75
  text "12.2" at 149.812,64.77 h0.75
  text "12.3" at 159.591,64.262 h0.75
  text "12.4" at 149.939,62.103 h0.75
  text "12.5" at 159.718,62.103 h0.75
  text "12.6" at 149.685,59.563 h0.75
  text "12.7" at 159.845,59.563 h0.75
  text "0.1" at 106.886,58.42 h0.75
  text "0.0" at 97.615,58.166 h0.75
  text "0.2" at 97.488,55.626 h0.75
  text "0.3" at 106.759,55.626 h0.75
  text "2.7" at 150.193,55.626 h0.75
  text "2.6" at 159.718,54.737 h0.75
  text "2.5" at 150.447,53.848 h0.75
  text "0.5" at 106.505,53.721 h0.75
  text "0.4" at 97.488,53.086 h0.75
  text "2.4" at 159.718,52.07 h0.75
  text "0.6" at 97.742,51.181 h0.75
  text "0.7" at 106.505,49.53 h0.75
  text "2.3" at 150.193,49.276 h0.75
  text "2.2" at 159.718,49.276 h0.75
  text "2.1" at 150.701,46.99 h0.75
  text "2.0" at 159.591,46.736 h0.75
  text "-" at 99.647,42.672 h0.75 r180
  text "-" at 108.41,42.672 h0.75 r180
  text "-" at 152.86,42.672 h0.75 r180
  text "-" at 160.861,42.672 h0.75 r180
  text "+" at 99.901,38.862 h0.75 r90
  text "+" at 153.114,38.862 h0.75 r90
  text "+" at 108.41,38.608 h0.75 r90
  text "+" at 161.115,38.608 h0.75 r90
  text "2" at 90.062,14.605 h20
Bottom Overlay:
  drawing of 488 lines, arcs and shapes, not listed